# Altium PCB Ethernet-Module.PcbDoc (part 1 of 2)
Units mm, origin at the board's own origin, x right, y up, seen from the top; angles counter-clockwise.
Board outline 33 x 53 mm, 2 copper layers (Top Layer, Bottom Layer), stack 0.97 mm thick; 59 components, 47 nets, 237 pads, 62 vias.
Unrouted connection lines stored in the file: 33.
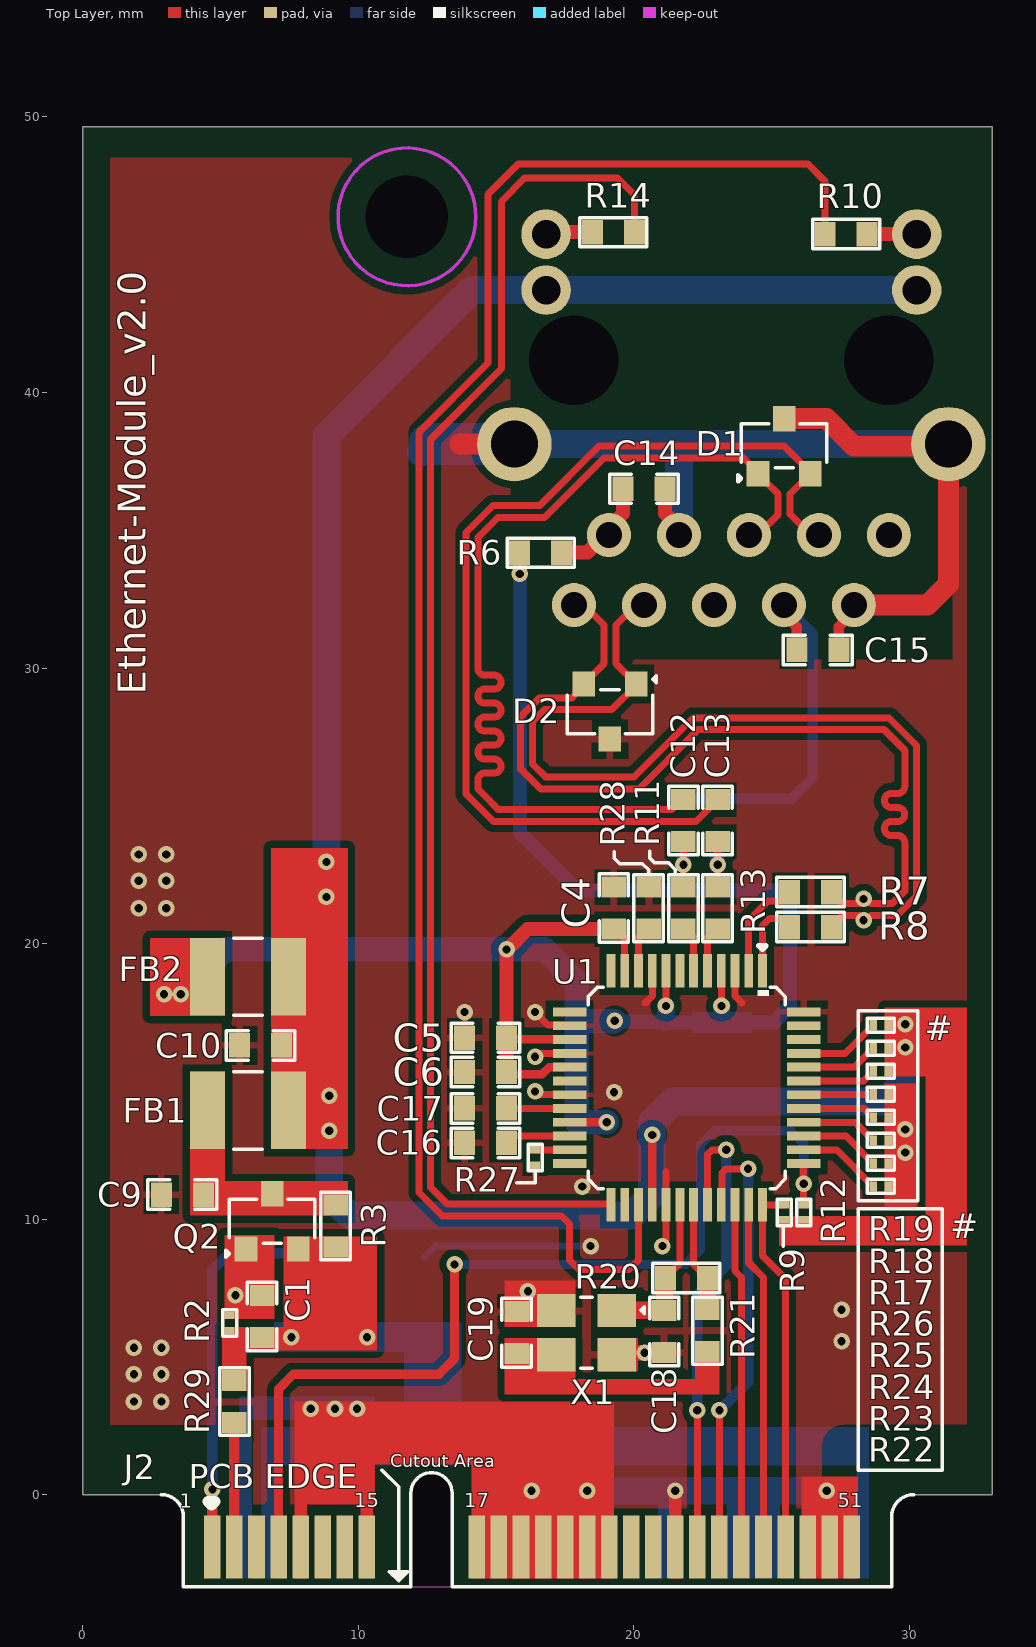
[diagram p0: Top Layer view]
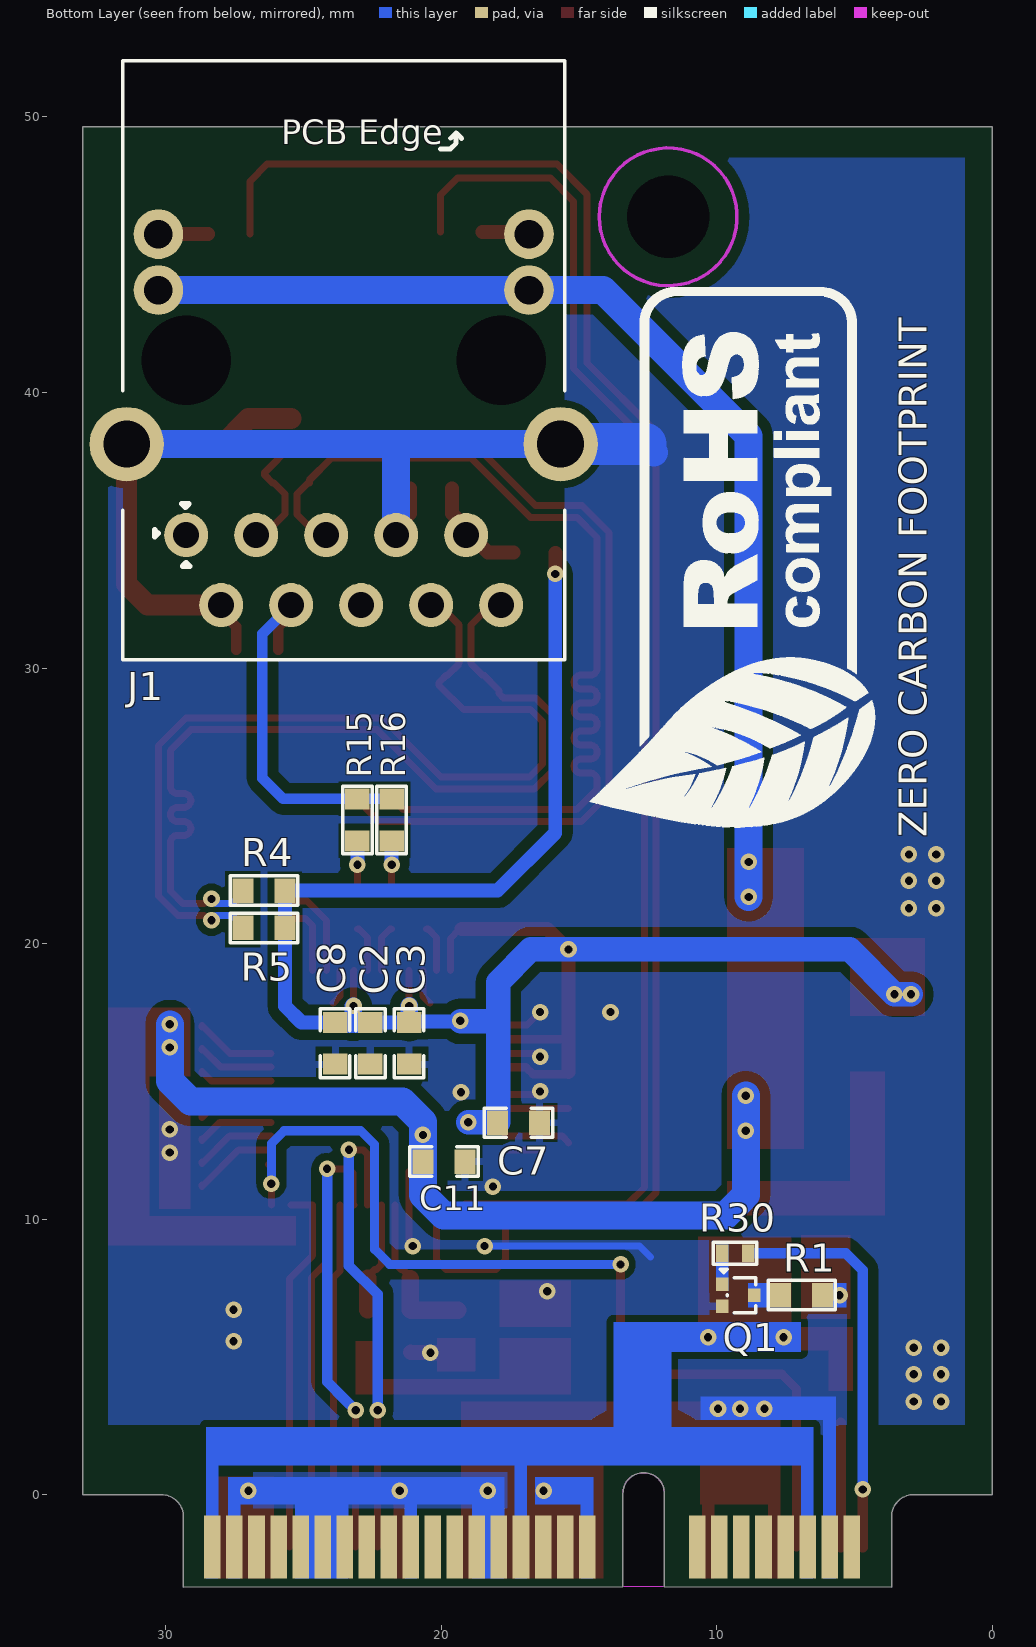
[diagram p1: Bottom Layer view, seen from below]
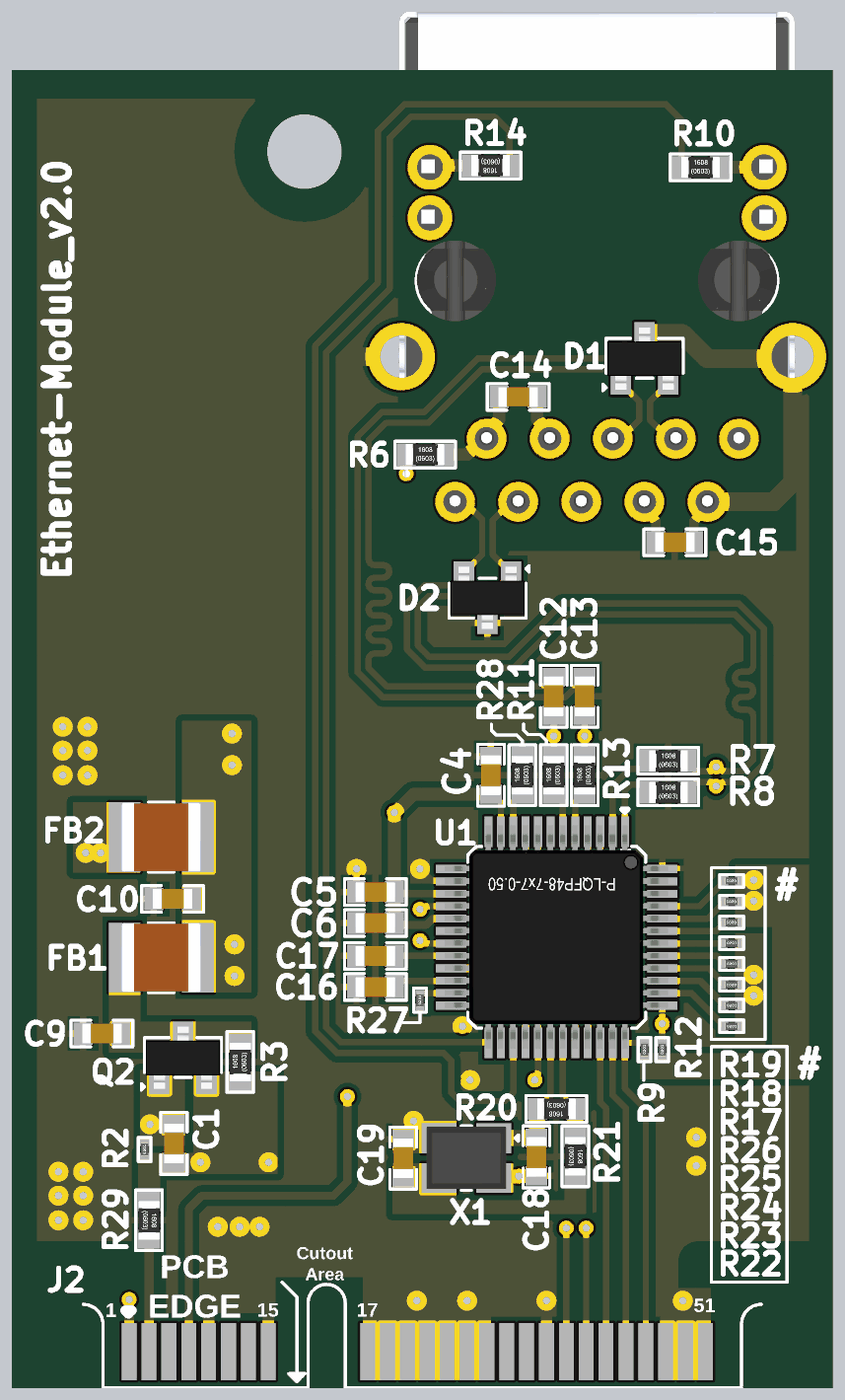
[diagram p2: 3D render of the assembled board from above, using the file's embedded part models]
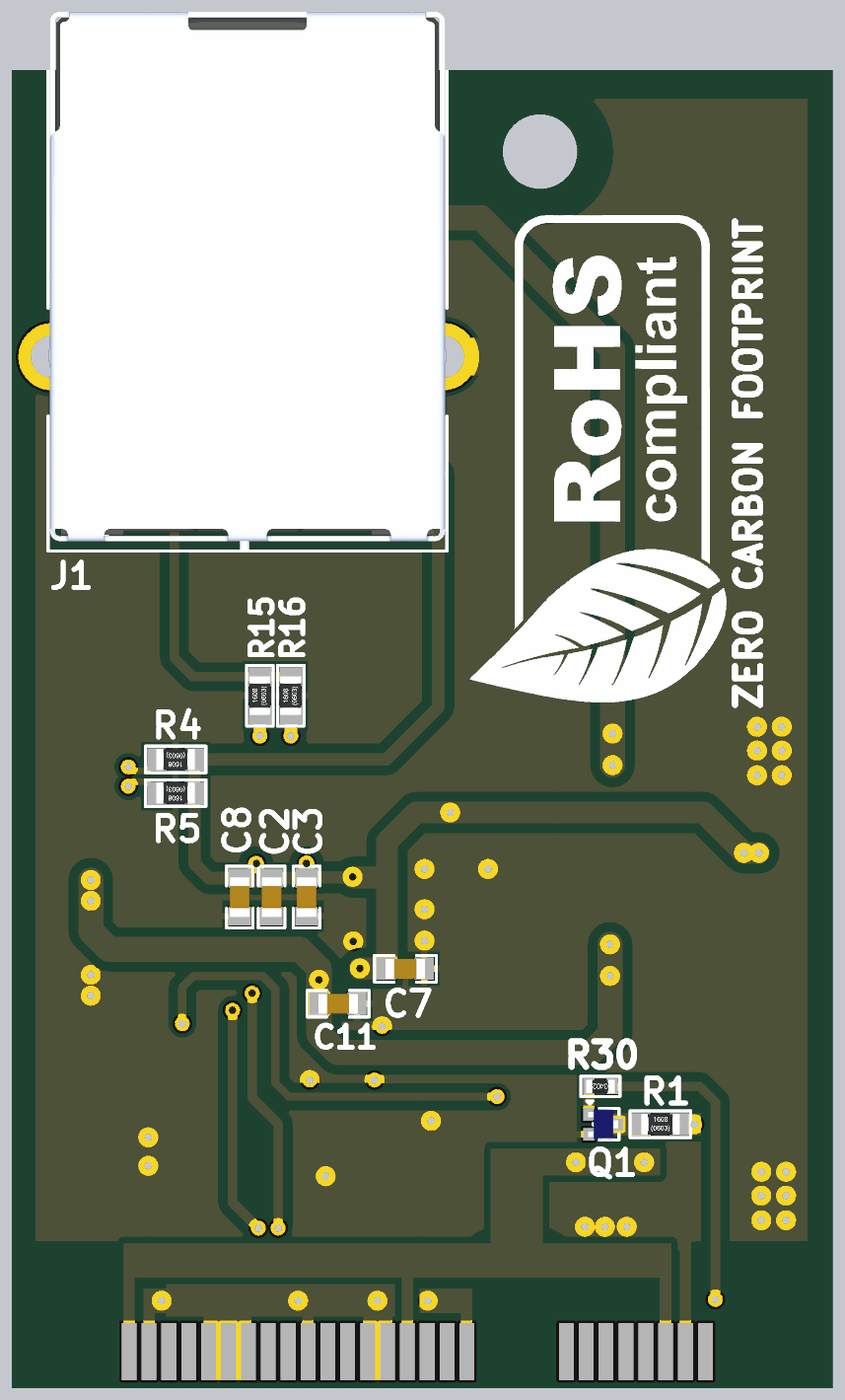
[diagram p3: 3D render of the assembled board from below, using the file's embedded part models]

## Layer stack, top to bottom
Top Solder: solder mask 0.015, Solder Resist, Dk 3.5
Top Layer: signal copper 0.035
Dielectric 1: dielectric 0.9, FR-4, Dk 4.8
Bottom Layer: signal copper 0.035
Bottom Solder: solder mask 0.015, Solder Resist, Dk 3.5

## Board outline
3.65,-3.355 3.65,-0.8 ccw(c2.85,-0.8) 2.85,0 0,0 0,49.642 33,49.642 33,0 30.15,0 ccw(c30.15,-0.8) 29.35,-0.8 29.35,-3.355 13.399,-3.35 13.399,-3.349 13.4,0.051 ccw(c12.65,0.051) 11.9,0.051 11.899,-3.349 11.899,-3.35
cut-out: 11.899,-3.349 13.399,-3.35 13.399,-3.349 13.4,0.051 ccw(c12.65,0.051) 11.9,0.051

## Design rules (kind name [scope] priority, off if disabled: settings)
Clearance Clearance_Top [OnLayer('Top Layer')] p1: gap=0.178 ignorepadtopadclearanceinfootprint=FALSE except(0.254: Arc-Fill Arc-Poly Arc-Region Track-Fill Track-Poly Track-Region SMDPad-Fill SMDPad-Poly SMDPad-Region THPad-Fill THPad-Poly THPad-Region Via-Fill Via-Poly Via-Region Fill-Fill Fill-Poly Fill-Region Poly-Poly Poly-Region Region-Region)
Clearance Clearance_Bottom [OnLayer('Bottom Layer')] p2: gap=0.178 ignorepadtopadclearanceinfootprint=FALSE except(0.254: SMDPad-Fill SMDPad-Poly SMDPad-Region Via-Fill Via-Poly Via-Region Fill-Fill Fill-Poly Fill-Region Poly-Poly Poly-Region Region-Region; 0.381: Arc-Fill Arc-Poly Arc-Region Track-Fill Track-Poly Track-Region THPad-Fill THPad-Poly THPad-Region)
DiffPairsRouting [All] p1: maxlimit=0.178 minlimit=0.178 mostfreqgap=0.178 toplayer_minwidth=0.254 toplayer_maxwidth=0.254 toplayer_prefwidth=0.254 bottomlayer_minwidth=0.254 bottomlayer_maxwidth=0.254 bottomlayer_prefwidth=0.254 impedanceprofiledriven=TRUE impedanceprofileid={129A74C7-0EF2-4F0A-B9E0-2A440151345B} impedanceprofilevalue=100.000000 maxuncoupledlength=12.7
HoleSize [All] p1: absolutevalues=TRUE maxlimit=25.4 minlimit=0.025 maxpercent=80.000 minpercent=20.000
HoleToHoleClearance [All] p1: gap=0.203 allowstackedmicrovias=TRUE
MatchedLengths "Schematic Matched Net Lengths_1" [InNetClass('EtherCAT_A')] p1: tolerance=0.508 checknetsindiffpair=FALSE checkdiffpairvsdiffpair=TRUE checkxsignals=TRUE checkothers=TRUE
MaxMinImpedance "Schematic Impedance Constraint_1" [InNetClass('EtherCAT_A')] p1: minimum=85.00 maximum=95.00
MinimumSolderMaskSliver [All] p1: minsoldermaskwidth=0
PolygonConnect [All] p1: thpad.connectstyle=Relief thpad.reliefconductorwidth=0.254 thpad.reliefentries=4 thpad.polygonreliefangle="90 Angle" thpad.airgapwidth=0.254 smdpad.connectstyle=Relief smdpad.reliefconductorwidth=0.254 smdpad.reliefentries=4 smdpad.polygonreliefangle="90 Angle" smdpad.airgapwidth=0.254 via.connectstyle=Direct via.reliefconductorwidth=0.254 via.reliefentries=4 via.polygonreliefangle="90 Angle" via.airgapwidth=0.254
RoutingVias [All] p1: holewidth=0.3 width=0.6 viastyle="Through Hole" minholewidth=0.3 minwidth=0.6 maxholewidth=0.3 maxwidth=0.6
SilkToSilkClearance [All] p1: silktosilkclearance=0
SilkToSolderMaskClearance [IsPad] p1: minsilkscreentomaskgap=0 clearancetoexposedcopper=TRUE
SolderMaskExpansion [All] p1: expansion=0.102 istentingtop=FALSE
UnRoutedNet [All] p1: checkbadconnections=TRUE
Width [All] p1: maxlimit=1.524 minlimit=0.254 preferedwidth=0.381 minimp=50.000000 maximp=50.000000 favimp=50.000000
23 further rules are at their usual default settings.

## Classes and differential pairs
differential pair class EtherCAT_A_Lines: RD TD
net class EtherCAT_A: RD_N RD_P TD_N TD_P
differential pair TD: +TD_P -TD_N
differential pair RD: +RD_P -RD_N

## Components (designator, comment, footprint, x,y, rotation, side; value= is the part's Value field where it differs from the comment)
C1 "22uF" Cap-0603 6.502,6.472 r270 top locked
C2 "0.1uF" Cap-0603 22.566,16.383 r90 bottom
C3 "0.1uF" Cap-0603 21.158,16.383 r90 bottom
C4 "0.1uF" Cap-0603 19.266,21.285 r270 top
C5 "0.1uF" Cap-0603 14.614,16.584 r0 top
C6 "0.1uF" Cap-0603 14.614,15.34 r0 top
C7 "0.1uF" Cap-0603 17.184,13.498 r0 bottom
C8 "10uF" Cap-0603 23.847,16.383 r90 bottom
C9 "22uF" Cap-0603 3.607,10.893 r0 top locked
C10 "10uF" Cap-0603 6.452,16.307 r0 top locked
C11 "0.1uF" Cap-0603 19.888,12.09 r0 bottom
C12 "6.8nF" Cap-0603 21.793,24.46 r270 top
C13 "6.8nF" Cap-0603 23.038,24.46 r270 top
C14 "22nF" Cap-0603 20.361,36.507 r180 top
C15 "10nF" Cap-0603 26.67,30.658 r180 top
C16 "10nF" Cap-0603 14.614,12.767 r0 top
C17 "4.7uF" Cap-0603 14.614,14.016 r0 top
C18 "12pF" Cap-0603 21.097,5.928 r90 top
C19 "12pF" Cap-0603 15.737,5.877 r270 top
D1 "SP0502BAHTG" SOT-23 25.451,38.049 r0 top
D2 "SP0502BAHTG" SOT-23 19.126,28.423 r180 top
FB1 "FBMH3225HM601NT" IND-1210 5.992,13.945 r0 top locked
FB2 "FBMH3225HM601NT" IND-1210 5.992,18.796 r180 top
J1 "ARJM11D7-114-AB-EW2" ARJM11D7-114-AB-EW2 23.536,39.106 r0 bottom locked
J2 "Mini PCIe" "Mini PCIE Pad" 4.7,-1.9 r0 top locked
Q1 "MMBT3904M" SOT-723 9.215,7.239 r270 bottom locked
Q2 "FDN306P" SOT-23 6.868,9.915 r0 top locked
R1 "1K" Res-0603 6.912,7.244 r0 bottom
R2 "10K" Res-0201 5.323,6.228 r90 top locked
R3 "0R" Res-0603 9.172,9.75 r270 top locked
R4 "49.9R" Res-0603 26.429,21.921 r180 bottom
R5 "49.9R" Res-0603 26.429,20.567 r180 bottom
R6 "10R" Res-0603 16.616,34.186 r180 top locked
R7 "33R" Res-0603 26.407,21.866 r180 top
R8 "33R" Res-0603 26.407,20.596 r180 top
R9 "10K" Res-0201 25.446,10.245 r90 top
R10 "330R" Res-0603 27.703,45.746 r180 top
R11 "33R" Res-0603 21.793,21.285 r270 top
R12 "10K" Res-0201 26.16,10.245 r90 top
R13 "33R" Res-0603 23.038,21.285 r270 top
R14 "330R" Res-0603 19.253,45.817 r0 top locked
R15 "49.9R" Res-0603 23.038,24.486 r270 bottom
R16 "49.9R" Res-0603 21.793,24.486 r270 bottom
R17 "10K" Res-0201 28.956,15.364 r180 top
R18 "10K" Res-0201 28.956,16.2 r180 top
R19 "10K" Res-0201 28.956,17.036 r180 top
R20 "1M" Res-0603 21.9,7.859 r0 top
R21 "0R" Res-0603 22.662,5.954 r90 top
R22 "10K" Res-0201 28.956,11.186 r0 top
R23 "10K" Res-0201 28.956,12.022 r0 top
R24 "10K" Res-0201 28.956,12.858 r180 top
R25 "10K" Res-0201 28.956,13.693 r0 top
R26 "10K" Res-0201 28.956,14.529 r0 top
R27 "10K" Res-0201 16.409,12.237 r90 top
R28 "12.4K" Res-0603 20.53,21.285 r270 top
R29 "0R" Res-0603 5.499,3.378 r90 top
R30 "4.7K" Res-0402 9.328,8.764 r0 bottom locked
U1 "W5500" "48-LQFP (7x7)_" 21.915,14.766 r270 top locked
X1 "25MHZ" NX3225GA-25MHZ-STD-CRG-2 18.277,5.877 r180 top

## Footprints (in the part's own frame and the unit in brackets; to place one, negate y for a bottom-side part, rotate by r counter-clockwise, add the part's x,y. Pads: shape width x height; smd on the part's side, far side on the other; paste and mask are expansions set on the pad)
"48-LQFP (7x7)_" [mm]
  rect 1.22x0.32 smd: 1(-4.25,2.75) 2(-4.25,2.25) 3(-4.25,1.75) 4(-4.25,1.25) 5(-4.25,0.75) 6(-4.25,0.25) 7(-4.25,-0.25) 8(-4.25,-0.75) 9(-4.25,-1.25) 10(-4.25,-1.75) 11(-4.25,-2.25) 12(-4.25,-2.75) 25(4.25,-2.75) 26(4.25,-2.25) 27(4.25,-1.75) 28(4.25,-1.25) 29(4.25,-0.75) 30(4.25,-0.25) 31(4.25,0.25) 32(4.25,0.75) 33(4.25,1.25) 34(4.25,1.75) 35(4.25,2.25) 36(4.25,2.75)
  rect 0.32x1.22 smd: 13(-2.75,-4.25) 14(-2.25,-4.25) 15(-1.75,-4.25) 16(-1.25,-4.25) 17(-0.75,-4.25) 18(-0.25,-4.25) 19(0.25,-4.25) 20(0.75,-4.25) 21(1.25,-4.25) 22(1.75,-4.25) 23(2.25,-4.25) 24(2.75,-4.25) 37(2.75,4.25) 38(2.25,4.25) 39(1.75,4.25) 40(1.25,4.25) 41(0.75,4.25) 42(0.25,4.25) 43(-0.25,4.25) 44(-0.75,4.25) 45(-1.25,4.25) 46(-1.75,4.25) 47(-2.25,4.25) 48(-2.75,4.25)
  silkscreen extent -5.16,-3.58 3.66,3.58, body extent -4.51,-4.51 4.49,4.49, height 1.43
ARJM11D7-114-AB-EW2 [mm]
  round 1.6 hole 0.94: 1(5.715,4.28) 2(4.445,6.82) 3(3.175,4.28) 4(1.905,6.82) 5(0.635,4.28) 6(-0.635,6.82) 7(-1.905,4.28) 8(-3.175,6.82) 9(-4.445,4.28) 10(-5.715,6.82)
  round 1.8 hole 1.04: 11(6.725,-4.61) 12(6.725,-6.64) 13(-6.725,-4.61) 14(-6.725,-6.64)
  round 0 hole 3.25 unplated: MH1(-5.715,-2.07) MH2(5.715,-2.07)
  round 2.7 hole 1.7: SH1(-7.875,0.98) SH2(7.875,0.98)
  silkscreen extent -8.03,-12.93 8.03,8.8, body extent -7.99,-12.9 7.99,8.75, height 13.8
Cap-0603 [mil]
  rect 30x35 smd mask+2.36: 1(-30,0) 2(30,0)
  silkscreen extent -49,-21 49,21, body extent -32,-16 31,16, height 34
IND-1210 [mm]
  rect 1.27x2.81 smd: 1(-1.471,0) 2(1.471,0)
  silkscreen extent -0.52,-1.4 0.52,1.4, body extent -1.6,-1.4 1.6,1.4, height 2.5
"Mini PCIE Pad" [mm]
  rect 0.6x2.3 smd: 1(0,0) 3(0.8,0) 5(1.6,0) 7(2.4,0) 9(3.2,0) 11(4,0) 13(4.8,0) 15(5.6,0) 17(9.6,0) 19(10.4,0) 21(11.2,0) 23(12,0) 25(12.8,0) 27(13.6,0) 29(14.4,0) 31(15.2,0) 33(16,0) 35(16.8,0) 37(17.6,0) 39(18.4,0) 41(19.2,0) 43(20,0) 45(20.8,0) 47(21.6,0) 49(22.4,0) 51(23.2,0)
  rect 0.6x2.3 smd far side: 2(0.4,0) 4(1.2,0) 6(2,0) 8(2.8,0) 10(3.6,0) 12(4.4,0) 14(5.2,0) 16(6,0) 18(10,0) 20(10.8,0) 22(11.6,0) 24(12.4,0) 26(13.2,0) 28(14,0) 30(14.8,0) 32(15.6,0) 34(16.4,0) 36(17.2,0) 38(18,0) 40(18.8,0) 42(19.6,0) 44(20.4,0) 46(21.2,0) 48(22,0) 50(22.8,0) 52(23.6,0)
  silkscreen extent -1.85,-1.45 25.45,2.79
NX3225GA-25MHZ-STD-CRG-2 [mm]
  rect 1.4x1.2 smd: 1(-1.1,-0.8) 2(1.1,-0.8) 3(1.1,0.8) 4(-1.1,0.8)
  silkscreen extent -2.09,-1.3 0.2,1.3, body extent -1.6,-1.26 1.6,1.24, height 0.8
Res-0201 [mm]
  rect 0.27x0.37 smd mask+0.055: 1(-0.275,0) 2(0.275,0)
  silkscreen extent -0.48,-0.25 0.48,0.25, body extent -0.3,-0.15 0.3,0.15, height 0.29
Res-0402 [mil]
  rect 18x25 smd mask+2.17: 1(-18.5,0) 2(18.5,0)
  silkscreen extent -32,-17 32,16, body extent -23,-11 23,11, height 16
Res-0603 [mil]
  rect 30x35 smd: 1(-30,0) 2(30,0)
  silkscreen extent -48,-21 48,21, body extent -31,-17 31,17, height 18
SOT-23 [mm] "TRANS NPN 40V 0.6A SOT23"
  rect 0.82x0.92 smd: 1(-0.95,-1) 2(0.95,-1) 3(0,1)
  silkscreen extent -1.68,-1.3 1.55,0.81, body extent -1.5,-1.25 1.5,1.25, height 1.05
SOT-723 [mm]
  rect 0.5x0.45 smd: 1(-0.4,-0.575) 2(0.4,-0.575) 3(0,0.575)
  silkscreen extent -0.94,-0.66 0.64,0.64, body extent -0.6,-0.6 0.6,0.6, height 0.5

## Part data
C1 C9: library part CC0603MRX5R6BB226, "CAP CER 22UF 10V X5R 0603", Case Code (Imperial)=0603, Case Code (Metric)=1608, Dielectric=X5R, LCSC Part Number=C109447, Manufacturer=Yageo, Max Operating Temperature=85°C, Min Operating Temperature=-55°C, Package Quantity=4000, Supplier Part Number 1=311-1819-1-ND, Tolerance=20%, Voltage Rating=10V, Capacitance=22uF, Case/Package=0603, Category="Ceramic Capacitors", ComponentLink1Description=http://www.mouser.com/ds/2/447/Yageo_UPY-GP_NP0_16V-to-50V_9-358835.pdf?src-supplier=Mouser, ComponentLink1URL=http://www.mouser.com/ds/2/447/Yageo_UPY-GP_NP0_16V-to-50V_9-358835.pdf?src-supplier=Mouser, ComponentLink2Description=http://www.yageo.com/documents/recent/UPY-GPHC_X5R_4V-to-50V_25.pdf?src-supplier=Digi-Key, ComponentLink2URL=http://www.yageo.com/documents/recent/UPY-GPHC_X5R_4V-to-50V_25.pdf?src-supplier=Digi-Key, Halogen Free="Halogen Free", Height=0.8mm, Item Type=Capacitor, Lead Free="Lead Free", Length=0.063inch, Manufacturer Part Number=CC0603MRX5R6BB226, Mount="Surface Mount", Packaging="Tape and Reel", Pricing 1="1=0.68000, 10=0.48000, 50=0.36300, 100=0.31610, 500=0.23416, 1000=0.19903 (USD)", RoHS=Yes, RoHS Compliant=Yes, Stock 1=19628, Supplier 1=Digi-Key, Termination=SMD/SMT, Thickness=0.035inch, Voltage Rating (DC)=10V, Weight=7.1E-05oz, Width=0.8mm
C2 C3 C4 C5 C6 C7 C11: library part CC0603KRX5R9BB104, "CAP CER 0.1UF 50V X5R 0603", Capacitance=100nF, Case Code (Imperial)=0603, Case Code (Metric)=1608, Dielectric=X5R, LCSC Part Number=C110022, Manufacturer=Yageo, Max Operating Temperature=85°C, Min Operating Temperature=-55°C, Package Quantity=4000, Supplier Part Number 1=311-4046-1-ND, Tolerance=10%, Voltage Rating=50V, Case/Package=0603, Category="Ceramic Capacitors", ComponentLink1Description=http://www.mouser.com/ds/2/447/Yageo_UPY-GP_NP0_16V-to-50V_9-358835.pdf?src-supplier=Mouser, ComponentLink1URL=http://www.mouser.com/ds/2/447/Yageo_UPY-GP_NP0_16V-to-50V_9-358835.pdf?src-supplier=Mouser, ComponentLink2Description=https://www.yageo.com/upload/media/product/productsearch/datasheet/mlcc/UPY-GPHC_X5R_4V-to-50V_26.pdf?src-supplier=Digi-Key, ComponentLink2URL=https://www.yageo.com/upload/media/product/productsearch/datasheet/mlcc/UPY-GPHC_X5R_4V-to-50V_26.pdf?src-supplier=Digi-Key, ComponentLink3Description=http://www.yageo.com/exep/pages/download/literatures/ProductSelectionGuide%202014_Final_2.pdf?src-supplier=Digi-Key, ComponentLink3URL=http://www.yageo.com/exep/pages/download/literatures/ProductSelectionGuide%202014_Final_2.pdf?src-supplier=Digi-Key, Halogen Free="Halogen Free", Item Type=Capacitor, Lead Free="Lead Free", Length=0.063inch, Manufacturer Part Number=CC0603KRX5R9BB104, Mount="Surface Mount", Packaging="Tape and Reel", Pricing 1="1=0.10000, 10=0.05200, 50=0.02820, 100=0.02310, 500=0.01648, 1000=0.01294 (USD)", RoHS=Yes, Stock 1=152253, Supplier 1=Digi-Key, Termination=SMD/SMT, Thickness=0.035inch, Voltage Rating (DC)=50V, Weight=7.1E-05oz, Width=0.031inch
C8 C10: library part C1608X5R1E106M080AC, "CAP CER 10UF 25V X5R 0603", Case Code (Imperial)=0603, Case Code (Metric)=1608, Dielectric=X5R, Dielectric Material=Ceramic, LCSC Part Number=C2168289, Manufacturer=TDK, Max Operating Temperature=85°C, Min Operating Temperature=-55°C, Package Quantity=1, Supplier Part Number 1=445-9015-1-ND, Tolerance=20%, Voltage Rating=25V, Capacitance=10uF, Case/Package=0603, Composition=Ceramic, Depth=0.8mm, Height=0.8mm, Lead Free="Lead Free", Length=1.6mm, Manufacturer Part Number=C1608X5R1E106M080AC, Mount="Surface Mount", Packaging="Tape and Reel", Pricing 1="1=0.96, 10=0.704, 100=0.483, 500=0.38238, 1000=0.322 (USD)", REACH SVHC="No SVHC", Stock 1=61681, Supplier 1=Digi-Key, Termination=SMD/SMT, Thickness=0.039inch, Voltage Rating (DC)=25V, Weight=7.1E-05oz, Width=0.8mm
C12 C13: library part 0603B682K500NT, "50V 6.8nF X7R ±10% 0603", LCSC Part Number=C1631, Manufacturer=FH, ComponentLink1Description=LCSC, ComponentLink1URL=https://www.lcsc.com/product-detail/Multilayer-Ceramic-Capacitors-MLCC-SMD-SMT_FH-Guangdong-Fenghua-Advanced-Tech-0603B682K500NT_C1631.html, Item Type=Capacitor, Manufacturer Part Number=0603B682K500NT
C14: library part CGA3E2X7R2A223K080AA, "CAP CER 0.022UF 100V X7R 0603", Case Code (Imperial)=0603, Case Code (Metric)=1608, Dielectric=X7R, LCSC Part Number=C2167165, Manufacturer=TDK, Max Operating Temperature=125°C, Min Operating Temperature=-55°C, Package Quantity=1, Ratings=AEC-Q200, Resistor Type=Ceramic, Supplier Part Number 1=445-5814-1-ND, Tolerance=10%, Voltage Rating=100V, Capacitance=22nF, Case/Package=0603, Category="Ceramic Capacitors", ComponentLink1Description=https://datasheet.ciiva.com/22725/1735406-22725648.pdf?src-supplier=Element14, ComponentLink1URL=https://datasheet.ciiva.com/22725/1735406-22725648.pdf?src-supplier=Element14, ComponentLink2Description=https://datasheet.ciiva.com/24218/cga3e2x7r2a223k080aa-266292-24218959.pdf?src-supplier=Mouser, ComponentLink2URL=https://datasheet.ciiva.com/24218/cga3e2x7r2a223k080aa-266292-24218959.pdf?src-supplier=Mouser, ComponentLink3Description=https://datasheet.ciiva.com/7975/1807242-7975349.pdf?src-supplier=Element14, ComponentLink3URL=https://datasheet.ciiva.com/7975/1807242-7975349.pdf?src-supplier=Element14, Depth=0.8mm, Height=0.8mm, Item Type=Capacitor, Length=1.6mm, Manufacturer Part Number=CGA3E2X7R2A223K080AA, Mount="Surface Mount", Packaging="Tape and Reel", Pricing 1="1=0.11000, 10=0.07600, 50=0.04340, 100=0.03590, 500=0.02516, 1000=0.02083 (USD)", REACH SVHC="No SVHC", RoHS=Yes, RoHS Compliant=Yes, Series=CGA, Stock 1=56079, Supplier 1=Digi-Key, Termination=SMD/SMT, Thickness=0.035inch, Voltage Rating (DC)=100V, Weight=7.1E-05oz, Width=0.031inch
C15 C16: library part AC0603KRX7R0BB103, "CAP CER 10000PF 100V X7R 0603", Case Code (Imperial)=0603, Case Code (Metric)=1608, LCSC Part Number=C149602, Manufacturer=Yageo, Max Operating Temperature=125°C, Min Operating Temperature=-55°C, Ratings=AEC-Q200, Supplier Part Number 1=1985307, Tolerance=10%, Voltage Rating=100V, Capacitance=10nF, Case/Package=0603, Category="Ceramic Capacitors", ComponentLink1Description=http://www.yageo.com/NewPortal/_en/search/productDocs.jsp?YageoPartNumber=AC0603KRX7R0BB103&src-supplier=Digi-Key, ComponentLink1URL=http://www.yageo.com/NewPortal/_en/search/productDocs.jsp?YageoPartNumber=AC0603KRX7R0BB103&src-supplier=Digi-Key, ComponentLink2Description=https://www.yageo.com/upload/media/product/productsearch/datasheet/mlcc/UPY-AC_NP0X7R_16V-to-630V_12.pdf?src-supplier=Digi-Key, ComponentLink2URL=https://www.yageo.com/upload/media/product/productsearch/datasheet/mlcc/UPY-AC_NP0X7R_16V-to-630V_12.pdf?src-supplier=Digi-Key, Item Type=Capacitor, Lead Free="Lead Free", Manufacturer Part Number=AC0603KRX7R0BB103, Mount="Surface Mount", Packaging="Tape and Reel", Pricing 1="250=0.02700, 1000=0.02500, 2000=0.02100 (GBP)", RoHS=Yes, RoHS Compliant=Yes, Stock 1=750, Supplier 1=RSComponents
C17: library part C1608X5R1E475KT000E, "CAP CER, 4.7 µF, 25 V, 0603", Case Code (Imperial)=0603, Case Code (Metric)=1608, Dielectric=X5R, Dielectric Material=Ceramic, LCSC Part Number=C76615, Manufacturer=TDK, Max Operating Temperature=85°C, Min Operating Temperature=-55°C, Package Quantity=4000, Supplier Part Number 1=2220Y1000562GCT-ND, Tolerance=10%, Voltage Rating=25V, Capacitance=4.7uF, Case/Package=0603, Category="Ceramic Capacitors", ComponentLink1Description=https://datasheet.ciiva.com/48587/6print-detail-pdf-phplangenpart-noc1608x5r1e475k080acimp-unit-xmhz-48587141.pdf?src-supplier=Onlinecomponents.com, ComponentLink1URL=https://datasheet.ciiva.com/48587/6print-detail-pdf-phplangenpart-noc1608x5r1e475k080acimp-unit-xmhz-48587141.pdf?src-supplier=Onlinecomponents.com, ComponentLink2Description=https://datasheet.ciiva.com/24216/mlcc-commercial-general-en-24216326.pdf?src-supplier=Mouser, ComponentLink2URL=https://datasheet.ciiva.com/24216/mlcc-commercial-general-en-24216326.pdf?src-supplier=Mouser, ComponentLink3Description=https://datasheet.ciiva.com/48671/mlcc-commercial-general-en-48671304.pdf?src-supplier=Avnet, ComponentLink3URL=https://datasheet.ciiva.com/48671/mlcc-commercial-general-en-48671304.pdf?src-supplier=Avnet, Depth=0.8mm, Height=0.8mm, Lead Free="Lead Free", Length=1.6mm, Manufacturer Part Number=C1608X5R1E475KT000E, Mount="Surface Mount", Packaging="Tape and Reel", Pricing 2="100=0.23400, 200=0.21900, 1000=0.20700, 2000=0.18700 (GBP)", REACH SVHC="No SVHC", Resistor Type=Ceramic, RoHS=No, Stock 2=16120, Supplier 1=Digi-Key, Supplier 2=RSComponents, Supplier Part Number 2=9159158P, Termination=SMD/SMT, Thickness=0.039inch, Voltage Rating (DC)=25V, Weight=7.1E-05oz, Width=0.031inch
C18 C19: library part GCM1885C2A120JA16D, "CAP CER 12PF 100V C0G/NP0 0603", Case Code (Imperial)=0603, Case Code (Metric)=1608, Dielectric=C0G, LCSC Part Number=C701298, Manufacturer=Murata, Max Operating Temperature=125°C, Min Operating Temperature=-55°C, Package Quantity=4000, Ratings=AEC-Q200, Tolerance=5%, Voltage Rating=100V, Capacitance=12pF, Case/Package=0603, Category="Ceramic Capacitors", ComponentLink1Description=https://datasheet.ciiva.com/26843/getdatasheetpartid-298064-26843669.pdf?src-supplier=Verical, ComponentLink1URL=https://datasheet.ciiva.com/26843/getdatasheetpartid-298064-26843669.pdf?src-supplier=Verical, ComponentLink2Description=https://datasheet.ciiva.com/29541/s0717e-29541093.pdf?src-supplier=Digi-Key, ComponentLink2URL=https://datasheet.ciiva.com/29541/s0717e-29541093.pdf?src-supplier=Digi-Key, ComponentLink3Description=https://datasheet.ciiva.com/29541/s0717e-29541094.pdf?src-supplier=Digi-Key, ComponentLink3URL=https://datasheet.ciiva.com/29541/s0717e-29541094.pdf?src-supplier=Digi-Key, ComponentLink4Description=https://datasheet.ciiva.com/29541/s0717e-29541095.pdf?src-supplier=Digi-Key, ComponentLink4URL=https://datasheet.ciiva.com/29541/s0717e-29541095.pdf?src-supplier=Digi-Key, Construction=Flat, Depth=0.8mm, Height=0.8mm, Lead Free="Lead Free", Length=1.6mm, Manufacturer Part Number=GCM1885C2A120JA16D, Mount="Surface Mount", Packaging="Tape and Reel", Pricing 1="4000=0.02030, 8000=0.01800, 12000=0.01680, 28000=0.01670, 100000=0.01630 (USD)", Radiation Hardening=No, RoHS=Yes, RoHS Compliant=Yes, Series=GCM, Stock 1=12000, Supplier 1="Arrow Electronics", Supplier Part Number 1=GCM1885C2A120JA16D, Termination=SMD/SMT, Thickness=0.035inch, Voltage Rating (DC)=100V, Width=0.031inch
D1 D2: "TVS DIODE 5.5VWM 8.5VC SOT23-3", LCSC Part Number=C207261, Manufacturer=Littelfuse, Supplier Part Number=5544929, Category="TVS Diodes", ComponentLink1Description=https://datasheet.ciiva.com/332/sp05xxba-332272.pdf?src-supplier=Digi-Key, ComponentLink1URL=https://datasheet.ciiva.com/332/sp05xxba-332272.pdf?src-supplier=Digi-Key, ComponentLink2Description=https://datasheet.ciiva.com/5771/littefuse-spa-sp050x-5771122.pdf?src-supplier=Farnell, ComponentLink2URL=https://datasheet.ciiva.com/5771/littefuse-spa-sp050x-5771122.pdf?src-supplier=Farnell, ComponentLink3Description=https://datasheet.ciiva.com/4508/sp05x-leadfree-4508925.pdf?src-supplier=Mouser, ComponentLink3URL=https://datasheet.ciiva.com/4508/sp05x-leadfree-4508925.pdf?src-supplier=Mouser, ComponentLink4Description=https://datasheet.ciiva.com/14536/70184671-14536037.pdf?src-supplier=Allied+Electronics, ComponentLink4URL=https://datasheet.ciiva.com/14536/70184671-14536037.pdf?src-supplier=Allied+Electronics, ComponentLink5Description=https://datasheet.ciiva.com/22735/526672-22735323.pdf?src-supplier=Element14, ComponentLink5URL=https://datasheet.ciiva.com/22735/526672-22735323.pdf?src-supplier=Element14, ComponentLink6Description=https://datasheet.ciiva.com/16392/sp05x-leadfree-16392807.pdf?src-supplier=Future+Electronics, ComponentLink6URL=https://datasheet.ciiva.com/16392/sp05x-leadfree-16392807.pdf?src-supplier=Future+Electronics, ComponentLink7Description=https://datasheet.ciiva.com/332/sp05xxba-332270.pdf?src-supplier=Digi-Key, ComponentLink7URL=https://datasheet.ciiva.com/332/sp05xxba-332270.pdf?src-supplier=Digi-Key, ComponentLink8Description=https://datasheet.ciiva.com/332/sp05xxba-332271.pdf?src-supplier=Digi-Key, ComponentLink8URL=https://datasheet.ciiva.com/332/sp05xxba-332271.pdf?src-supplier=Digi-Key, Item Type="TVS Diode", Manufacturer Part Number=SP0502BAHTG, Pricing="1=0.78, 15=0.685, 75=0.625, 300=0.575, 1500=0.52 (USD)", RoHS=Yes, Stock=1160, Supplier="Future Electronics"
FB1 FB2: "FERRITE BEAD 600 OHM 1210 1LN", Case Code (Imperial)=1210, Case Code (Metric)=3225, Current Rating=3A, DC Resistance (DCR)=42mR, Frequency=100MHz, LCSC Part Number=C268004, Manufacturer="Taiyo Yuden", Max Operating Temperature=125°C, Min Operating Temperature=-40°C, Package Quantity=1, Resistor Type="Ferrite Bead", Tolerance=30%, Case/Package=1210, Category="Ferrite Beads and Chips", ComponentLink1Description=https://datasheet.ciiva.com/6212/fbmh3225hm601nt-ss-6212657.pdf?src-supplier=Digi-Key, ComponentLink1URL=https://datasheet.ciiva.com/6212/fbmh3225hm601nt-ss-6212657.pdf?src-supplier=Digi-Key, ComponentLink2Description=https://datasheet.ciiva.com/16001/44fbmh3225hm601nt-16001086.pdf?src-supplier=Onlinecomponents.com, ComponentLink2URL=https://datasheet.ciiva.com/16001/44fbmh3225hm601nt-16001086.pdf?src-supplier=Onlinecomponents.com, ComponentLink3Description=https://datasheet.ciiva.com/25614/0900766b810b37be-25614375.pdf?src-supplier=Rs, ComponentLink3URL=https://datasheet.ciiva.com/25614/0900766b810b37be-25614375.pdf?src-supplier=Rs, ComponentLink4Description=https://datasheet.ciiva.com/7966/chipbeads01-e-7966154.pdf?src-supplier=Element14, ComponentLink4URL=https://datasheet.ciiva.com/7966/chipbeads01-e-7966154.pdf?src-supplier=Element14, ComponentLink5Description=https://datasheet.ciiva.com/1014/chipbeads01-e-1014606.pdf?src-supplier=Digi-Key, ComponentLink5URL=https://datasheet.ciiva.com/1014/chipbeads01-e-1014606.pdf?src-supplier=Digi-Key, ComponentLink6Description=https://datasheet.ciiva.com/1014/chipbeads01-e-1014605.pdf?src-supplier=Digi-Key, ComponentLink6URL=https://datasheet.ciiva.com/1014/chipbeads01-e-1014605.pdf?src-supplier=Digi-Key, Core Material=Ferrite, Depth=2.8mm, Halogen Free="Halogen Free", Height=2.8mm, Impedance=600R, Item Type="Ferrite Bead", Lead Free="Lead Free", Length=3.2mm, Manufacturer Part Number=FBMH3225HM601NT, Material=Ferrite, Max Current Rating=3A, Max DC Current=3A, Mounting Technology="Surface Mount", Number of Lines=1, Packaging="Tape and Reel", Pins=2, Pricing 1="1000=0.11115, 2000=0.10925, 4000=0.10735, 6000=0.10545, 8000=0.10355 (USD)", Reach SVHC Compliant=Yes, RoHS=Yes, RoHS Compliant=Yes, Series=FB, Shielding=Unshielded, Stock 1=56700, Supplier 1=Avnet, Supplier Part Number 1=FBMH3225HM601NT, Termination=SMD/SMT, Test Frequency=100MHz, Width=0.098inch
J1: "CONN JACK 1PORT 100 BASE-T PCB", Color=Green,Yellow, Manufacturer=Abracon, Max Operating Temperature=85°C, Min Operating Temperature=-40°C, Supplier Part Number 1=815-RJM11D7114ABEW2, Category="Modular / Ethernet Connectors", ComponentLink1Description=https://abracon.com/Magnetics/ARJM11.pdf?src-supplier=Digi-Key, ComponentLink1URL=https://abracon.com/Magnetics/ARJM11.pdf?src-supplier=Digi-Key, Connector Type=RJ45, Contact Plating=Gold, Direction=Up, Item Type="Ethernet Connector", Manufacturer Part Number=ARJM11D7-114-AB-EW2, Mounting Technology="Through Hole", Number of Cores per Jack=4, Number of Ports=1, Number of Rows=1, Packaging=Tray, Pricing 1="1=3.42, 10=3.29, 50=2.88, 100=2.73, 1000=1.98, 10000=1.77 (USD)", RoHS=Yes, RoHS Compliant=Yes, Series=ARJM11, Shielding=Shielded, Stock 1=4503, Supplier 1=Mouser, Termination=Solder
J2: "PCI Express Mini Card (Mini PCIe)"
Q1: "40V 100mW 100@10mA,1V 200mA 300MHz 300mV@50mA,5mA NPN -55℃~+150℃@(Tj) SOT-723 Bipolar Transistors - BJT ROHS", LCSC Part Number=C2923360, Manufacturer="TECH PUBLIC", Package=SOT-723, ComponentLink1Description=LCSC, ComponentLink1URL=https://www.lcsc.com/product-detail/Bipolar-Transistors-BJT_TECH-PUBLIC-MMBT3904M_C2923360.html, Item Type=Mosfet, Manufacturer Part Number=MMBT3904M
Q2: "MOSFET P-CH 12V 2.6A SUPERSOT3", Case/Package=TO-236-3, Continuous Drain Current (ID)=2.6A, Current=26A, Current Rating=-2.6A, Drain to Source Breakdown Voltage=-12V, Drain to Source Resistance=40mR, Drain to Source Voltage (Vdss)=12V, Drain-source On Resistance-Max=40MR, Gate to Source Voltage (Vgs)=8V, Input Capacitance=1.138nF, LCSC Part Number=C725031, Manufacturer="ON Semiconductor / Fairchild", Max Operating Temperature=150°C, Max Power Dissipation=500mW, Min Operating Temperature=-55°C, Package Quantity=3000, Supplier Part Number 1=FDN306PCT-ND, Threshold Voltage=-600mV, Category=MOSFETs, ComponentLink1Description=https://datasheet.ciiva.com/6383/fdn306p-6383301.pdf?src-supplier=Digi-Key, ComponentLink1URL=https://datasheet.ciiva.com/6383/fdn306p-6383301.pdf?src-supplier=Digi-Key, ComponentLink2Description=https://datasheet.ciiva.com/4439/fdn306p-50876-4439911.pdf?src-supplier=Mouser, ComponentLink2URL=https://datasheet.ciiva.com/4439/fdn306p-50876-4439911.pdf?src-supplier=Mouser, ComponentLink3Description=https://datasheet.ciiva.com/27050/889760-27050636.pdf?src-supplier=Jameco, ComponentLink3URL=https://datasheet.ciiva.com/27050/889760-27050636.pdf?src-supplier=Jameco, ComponentLink4Description=https://datasheet.ciiva.com/14170/fdn306p-eng-tds-14170925.pdf?src-supplier=Distrelec, ComponentLink4URL=https://datasheet.ciiva.com/14170/fdn306p-eng-tds-14170925.pdf?src-supplier=Distrelec, ComponentLink5Description=https://datasheet.ciiva.com/22700/264983-22700885.pdf?src-supplier=Element14, ComponentLink5URL=https://datasheet.ciiva.com/22700/264983-22700885.pdf?src-supplier=Element14, ComponentLink6Description=https://datasheet.ciiva.com/26144/fdn306p-26144214.pdf?src-supplier=Avnet+Europe, ComponentLink6URL=https://datasheet.ciiva.com/26144/fdn306p-26144214.pdf?src-supplier=Avnet+Europe, ComponentLink7Description=https://datasheet.ciiva.com/6383/fdn306p-6383304.pdf?src-supplier=Digi-Key, ComponentLink7URL=https://datasheet.ciiva.com/6383/fdn306p-6383304.pdf?src-supplier=Digi-Key, ComponentLink8Description=https://datasheet.ciiva.com/11175/fdn306p-11175160.pdf?src-supplier=Avnet, ComponentLink8URL=https://datasheet.ciiva.com/11175/fdn306p-11175160.pdf?src-supplier=Avnet, ComponentLink9Description=https://datasheet.ciiva.com/6383/fdn306p-6383306.pdf?src-supplier=Digi-Key, ComponentLink9URL=https://datasheet.ciiva.com/6383/fdn306p-6383306.pdf?src-supplier=Digi-Key, ComponentLink10Description=https://datasheet.ciiva.com/17275/fdn306p-17275114.pdf?src-supplier=Future+Electronics, ComponentLink10URL=https://datasheet.ciiva.com/17275/fdn306p-17275114.pdf?src-supplier=Future+Electronics, ComponentLink11Description=https://datasheet.ciiva.com/22655/fdn306p-22655327.pdf?src-supplier=Element14, ComponentLink11URL=https://datasheet.ciiva.com/22655/fdn306p-22655327.pdf?src-supplier=Element14, Contact Plating=Tin,Matte, Dual Supply Voltage=-12V, Element Configuration=Single, Fall Time=10ns, Height=0.94mm, Lead Free="Lead Free", Length=2.92mm, Manufacturer Part Number=FDN306P, Mount="Surface Mount", Nominal Vgs=-600mV, Number of Elements=1, Number of Pins=3, On-State Resistance=40MR, Packaging="Tape and Reel", Polarity=P-CHANNEL, Power Dissipation=500mW, Pricing 1="1=0.59000, 10=0.50700, 25=0.47360, 100=0.37880, 500=0.29766, 1000=0.23001 (USD)", Radiation Hardening=No, Rds On Max=40mR, REACH SVHC="No SVHC", Rise Time=10ns, RoHS=Yes, RoHS Compliant=Yes, Series=PowerTrench®, Stock 1=12409, Supplier 1=Digi-Key, Termination=SMD/SMT, Turn-Off Delay Time=38ns, Turn-On Delay Time=11ns, Voltage=12V, Voltage Rating (DC)=-12V, Width=1.4mm
R1: library part RC0603FR-071KL, "RES SMD 1K OHM 1% 1/10W 0603", Case Code (Imperial)=0603, Case Code (Metric)=1608, LCSC Part Number=C22548, Manufacturer=Yageo, Max Operating Temperature=155°C, Min Operating Temperature=-55°C, Power Rating=100mW, Resistance=1kR, Supplier Part Number 1=311-1.00KHRDKR-ND, Temperature Coefficient=100ppm/°C, Tolerance=1%, Voltage Rating=50V, Case/Package=0603, ComponentLink1Description=https://www.verical.com/server-webapp/html/getDatasheet?partID=409289&src-supplier=Verical, ComponentLink1URL=https://www.verical.com/server-webapp/html/getDatasheet?partID=409289&src-supplier=Verical, ComponentLink2Description=http://documents.rs-components.com/techlib://itc_doclist_GB.htm?stockno=5048928&src-supplier=RSComponents, ComponentLink2URL=http://documents.rs-components.com/techlib://itc_doclist_GB.htm?stockno=5048928&src-supplier=RSComponents, ComponentLink3Description=http://www.yageo.com/documents/recent/PYu-RC0603_51_RoHS_L_4.pdf?src-supplier=Avnet+Europe, ComponentLink3URL=http://www.yageo.com/documents/recent/PYu-RC0603_51_RoHS_L_4.pdf?src-supplier=Avnet+Europe, ComponentLink4Description=http://www.farnell.com/datasheets/2167052.pdf?src-supplier=Element14, ComponentLink4URL=http://www.farnell.com/datasheets/2167052.pdf?src-supplier=Element14, ComponentLink5Description=http://www.farnell.com/datasheets/1868787.pdf?src-supplier=Element14, ComponentLink5URL=http://www.farnell.com/datasheets/1868787.pdf?src-supplier=Element14, ComponentLink6Description=http://www.yageo.com/documents/recent/PYu-RC_Group_51_RoHS_L_2.pdf?src-supplier=Avnet, ComponentLink6URL=http://www.yageo.com/documents/recent/PYu-RC_Group_51_RoHS_L_2.pdf?src-supplier=Avnet, ComponentLink7Description=https://www.verical.com/server-webapp/html/getDatasheet?partID=404327&src-supplier=Verical, ComponentLink7URL=https://www.verical.com/server-webapp/html/getDatasheet?partID=404327&src-supplier=Verical, ComponentLink8Description=http://www.farnell.com/datasheets/443971.pdf?src-supplier=Element14, ComponentLink8URL=http://www.farnell.com/datasheets/443971.pdf?src-supplier=Element14, Composition="Thick Film", Contact Plating=Tin,Matte, Depth=0.8mm, Height=0.45mm, Item Type=Resistor, Lead Free="Lead Free", Length=1.6mm, Manufacturer Part Number=RC0603FR-071KL, Military Standard=Not, Packaging="Tape and Reel", Pricing 1="1=0.1, 10=0.023, 100=0.0094, 1000=0.0042, 2500=0.0037 (USD)", Radiation Hardening=No, REACH SVHC="No SVHC", Stock 1=21472395, Supplier 1=Digi-Key, Termination=SMD/SMT
R2 R9 R12 R17 R18 R19 R22 R23 R24 R25 R26 R27: library part RC0201FR-0710KL, "RES SMD 10K OHM 1% 1/20W 0201", LCSC Part Number=C106225, Manufacturer=Yageo, Package=0201, ComponentLink7Description=LCSC, ComponentLink7URL=https://www.lcsc.com/product-detail/Chip-Resistor-Surface-Mount_YAGEO-RC0201FR-0710KL_C106225.html, Item Type=Resistor, Manufacturer Part Number=RC0201FR-0710KL
R3 R21 R29: library part RC0603FR-070RL, "RES SMD 0R, 1%, 0.1W, 0603", LCSC Part Number=C100044, Manufacturer=Yageo, Package=0603, ComponentLink9Description=LCSC, ComponentLink9URL=https://www.lcsc.com/product-detail/Chip-Resistor-Surface-Mount_YAGEO-RC0603FR-070RL_C100044.html, Item Type=Resistor, Manufacturer Part Number=RC0603FR-070RL
R4 R5 R15 R16: library part RC0603FR-0749R9L, "RES 49.9 OHM 1% 1/10W 0603", Case Code (Imperial)=0603, Case Code (Metric)=1608, LCSC Part Number=C114625, Manufacturer=Yageo, Max Operating Temperature=155°C, Max Power Dissipation=100mW, Min Operating Temperature=-55°C, Resistance Tolerance=1%, Resistor Type="Thick Film", Temperature Coefficient=100ppm/°C, Voltage Rating=50V, Case/Package=0603, Category="Chip SMD Resistors", ComponentLink1Description=https://datasheet.ciiva.com/11808/0900766b80f96399-11808223.pdf?src-supplier=RSComponents, ComponentLink1URL=https://datasheet.ciiva.com/11808/0900766b80f96399-11808223.pdf?src-supplier=RSComponents, ComponentLink2Description=https://datasheet.ciiva.com/22747/443971-22747527.pdf?src-supplier=Element14, ComponentLink2URL=https://datasheet.ciiva.com/22747/443971-22747527.pdf?src-supplier=Element14, ComponentLink3Description=https://datasheet.ciiva.com/15189/getdatasheetpartid-325421-15189750.pdf?src-supplier=Verical, ComponentLink3URL=https://datasheet.ciiva.com/15189/getdatasheetpartid-325421-15189750.pdf?src-supplier=Verical, Construction=Rectangular, Depth=0.8mm, Features="Moisture Resistant", Height=0.45mm, Item Type=Resistor, Lead Free="Lead Free", Length=1.6mm, Manufacturer Part Number=RC0603FR-0749R9L, Military Standard=Not, Number of Pins=2, Number of Terminations=2, Packaging="Tape and Reel", Power Rating=100mW, Pricing 1="5000=0.00280 (USD)", REACH SVHC="No SVHC", Resistance=49.9R, RoHS=Yes, RoHS Compliant=Yes, Series=RC, Size Code=0603, Stock 1=2075000, Supplier 1="Arrow Electronics", Supplier Part Number 1=RC0603FR-0749R9L, Technology="THICK FILM", Termination=SMD/SMT, Tolerance=1%, Voltage Rating (DC)=50V
R6: library part RC0603FR-0710RL, "RES SMD 10 OHM 1% 1/10W 0603", Case Code (Imperial)=0603, Case Code (Metric)=1608, LCSC Part Number=C109318, Manufacturer=Yageo, Max Operating Temperature=155°C, Min Operating Temperature=-55°C, Power Rating=100mW, Supplier Part Number 1=311-10.0HRDKR-ND, Temperature Coefficient=200ppm/°C, Tolerance=1%, Voltage Rating=50V, Case/Package=0603, ComponentLink1Description=http://www.farnell.com/datasheets/1868787.pdf?src-supplier=Element14, ComponentLink1URL=http://www.farnell.com/datasheets/1868787.pdf?src-supplier=Element14, ComponentLink2Description=http://www.yageo.com/documents/recent/PYu-RC0603_51_RoHS_L_4.pdf?src-supplier=Avnet, ComponentLink2URL=http://www.yageo.com/documents/recent/PYu-RC0603_51_RoHS_L_4.pdf?src-supplier=Avnet, ComponentLink3Description=http://documents.rs-components.com/techlib://itc_doclist_GB.htm?stockno=5048984&src-supplier=RSComponents, ComponentLink3URL=http://documents.rs-components.com/techlib://itc_doclist_GB.htm?stockno=5048984&src-supplier=RSComponents, ComponentLink4Description=http://www.yageo.com/documents/recent/PYu-RC0603_51_RoHS_L_4.pdf?src-supplier=Avnet+Europe, ComponentLink4URL=http://www.yageo.com/documents/recent/PYu-RC0603_51_RoHS_L_4.pdf?src-supplier=Avnet+Europe, Composition="Thick Film", Contact Plating=Tin,Matte, Depth=0.8mm, Height=0.45mm, Item Type=Resistor, Lead Free="Lead Free", Length=1.6mm, Manufacturer Part Number=RC0603FR-0710RL, Military Standard=Not, Number of Pins=2, Packaging="Tape and Reel", Pricing 1="1=0.1, 10=0.046, 100=0.0187, 1000=0.0084, 2500=0.00729 (USD)", Radiation Hardening=No, REACH SVHC="No SVHC", Resistance=10R, Stock 1=10836596, Supplier 1=Digi-Key, Termination=SMD/SMT, Voltage Rating (DC)=50V, Width=0.8mm
R7 R8 R11 R13: library part RC0603FR-0733RL, "RES SMD 0603 33 Ohm 1% 1/10W", Case Code (Imperial)=0603, Case Code (Metric)=1608, LCSC Part Number=C108661, Manufacturer=Yageo, Max Operating Temperature=155°C, Max Power Dissipation=100mW, Min Operating Temperature=-55°C, Package Quantity=1, Resistance Tolerance=1%, Resistor Type="Thick Film", Supplier Part Number 1=311-33.0HRCT-ND, Temperature Coefficient=100ppm/°C, Voltage Rating=75V, Voltage Rating (DC)=50V, Case/Package=0603, Category="Chip SMD Resistors", ComponentLink1Description=https://datasheet.ciiva.com/11808/0900766b80f96399-11808741.pdf?src-supplier=RSComponents, ComponentLink1URL=https://datasheet.ciiva.com/11808/0900766b80f96399-11808741.pdf?src-supplier=RSComponents, ComponentLink2Description=https://datasheet.ciiva.com/2453/pyu-r-int-thick-7-2453952.pdf?src-supplier=Digi-Key, ComponentLink2URL=https://datasheet.ciiva.com/2453/pyu-r-int-thick-7-2453952.pdf?src-supplier=Digi-Key, ComponentLink3Description=https://datasheet.ciiva.com/2453/pyu-r-int-thick-7-2453953.pdf?src-supplier=Digi-Key, ComponentLink3URL=https://datasheet.ciiva.com/2453/pyu-r-int-thick-7-2453953.pdf?src-supplier=Digi-Key, ComponentLink4Description=https://datasheet.ciiva.com/2453/pyu-r-int-thick-7-2453954.pdf?src-supplier=Digi-Key, ComponentLink4URL=https://datasheet.ciiva.com/2453/pyu-r-int-thick-7-2453954.pdf?src-supplier=Digi-Key, ComponentLink5Description=https://datasheet.ciiva.com/7660/38590-7660792.pdf?src-supplier=Element14, ComponentLink5URL=https://datasheet.ciiva.com/7660/38590-7660792.pdf?src-supplier=Element14, ComponentLink6Description=https://datasheet.ciiva.com/15189/getdatasheetpartid-326673-15189708.pdf?src-supplier=Verical, ComponentLink6URL=https://datasheet.ciiva.com/15189/getdatasheetpartid-326673-15189708.pdf?src-supplier=Verical, ComponentLink7Description=https://datasheet.ciiva.com/7746/443971-7746334.pdf?src-supplier=Element14, ComponentLink7URL=https://datasheet.ciiva.com/7746/443971-7746334.pdf?src-supplier=Element14, ComponentLink8Description=https://datasheet.ciiva.com/7746/443971-7746335.pdf?src-supplier=Element14, ComponentLink8URL=https://datasheet.ciiva.com/7746/443971-7746335.pdf?src-supplier=Element14, ComponentLink9Description=https://datasheet.ciiva.com/46395/443971-46395007.pdf?src-supplier=Element14, ComponentLink9URL=https://datasheet.ciiva.com/46395/443971-46395007.pdf?src-supplier=Element14, Construction=Rectangular, Depth=0.8mm, Features="Moisture Resistant", Height=0.45mm, Item Type=Resistor, Lead Free="Lead Free", Lead Pitch=0.3mm, Length=1.6mm, Manufacturer Part Number=RC0603FR-0733RL, Military Standard=Not, Number of Pins=2, Number of Terminations=2, Packaging="Tape and Reel", Power Rating=100mW, Pricing 1="1=0.10000, 10=0.02400, 100=0.00970, 1000=0.00436, 2500=0.00378 (USD)", REACH SVHC="No SVHC", Resistance=33R, RoHS=Yes, RoHS Compliant=Yes, Series=RC, Size Code=0603, Stock 1=41, Supplier 1=Digi-Key, Technology="THICK FILM", Termination=SMD/SMT, Tolerance=1%, Weight=7.1E-05oz, Width=0.8mm
R10 R14: library part RC0603JR-07330RL, "RES  SMD 330R 100 mW 0603", Case Code (Imperial)=0603, Case Code (Metric)=1608, LCSC Part Number=C105879, Manufacturer=Yageo, Max Operating Temperature=155°C, Max Power Dissipation=100mW, Min Operating Temperature=-55°C, Package Quantity=5000, Resistance Tolerance=5%, Resistor Type="Thick Film", Supplier Part Number 1=311-330GRCT-ND, Temperature Coefficient=100ppm/°C, Voltage Rating=50V, Case/Package=0603, Category="Chip SMD Resistors", Construction=Rectangular, Depth=0.8mm, Features="Moisture Resistant", Height=0.45mm, Item Type=Resistor, Lead Free="Lead Free", Length=1.6mm, Manufacturer Part Number=RC0603JR-07330RL, Military Standard=Not, Number of Pins=2, Number of Terminations=2, Packaging="Tape and Reel", Power Rating=100mW, Pricing 1="1=0.10000, 10=0.02000, 100=0.00800, 1000=0.00360, 2500=0.00312 (USD)", REACH SVHC="No SVHC", Resistance=330R, RoHS=Yes, RoHS Compliant=Yes, Series=RC, Size Code=0603, Stock 1=1074593, Supplier 1=Digi-Key, Termination=SMD/SMT, Tolerance=5%, Voltage Rating (DC)=50V, Width=0.8mm
R20: library part RC0603FR-071ML, "RES SMD 1M OHM 1% 1/10W 0603", Case Code (Imperial)=0603, Case Code (Metric)=1608, LCSC Part Number=C105578, Manufacturer=Yageo, Max Operating Temperature=155°C, Min Operating Temperature=-55°C, Package Quantity=5000, Power Rating=100mW, Resistance=1MR, Supplier Part Number 1=311-1.00MHRDKR-ND, Temperature Coefficient=100ppm/°C, Tolerance=1%, Voltage Rating=50V, Case/Package=0603, ComponentLink1Description=http://www.farnell.com/datasheets/2167052.pdf?src-supplier=Mouser, ComponentLink1URL=http://www.farnell.com/datasheets/2167052.pdf?src-supplier=Mouser, ComponentLink2Description=http://www.farnell.com/datasheets/2167052.pdf?src-supplier=Element14, ComponentLink2URL=http://www.farnell.com/datasheets/2167052.pdf?src-supplier=Element14, ComponentLink3Description=http://documents.rs-components.com/techlib://itc_doclist_GB.htm?stockno=5048956&src-supplier=RSComponents, ComponentLink3URL=http://documents.rs-components.com/techlib://itc_doclist_GB.htm?stockno=5048956&src-supplier=RSComponents, Composition="Thick Film", Depth=0.8mm, Height=0.45mm, Lead Free="Lead Free", Length=1.6mm, Manufacturer Part Number=RC0603FR-071ML, Military Standard=Not, Number of Pins=2, Packaging="Tape and Reel", Pricing 1="1=0.1, 10=0.023, 100=0.0094, 1000=0.00421, 2500=0.00366 (USD)", REACH SVHC="No SVHC", Stock 1=3824601, Supplier 1=Digi-Key, Termination=SMD/SMT, Voltage Rating (DC)=50V, Width=0.8mm
R28: library part RC0603FR-0712K4L, "RES SMD 12.4K OHM 1% 1/10W 0603", Case Code (Imperial)=0603, Case Code (Metric)=1608, LCSC Part Number=C137798, Manufacturer=Yageo, Max Operating Temperature=155°C, Max Power Dissipation=100mW, Min Operating Temperature=-55°C, Package Quantity=1, Resistance=12.4kR, Resistor Type="Thick Film", Supplier Part Number 1=311-12.4KHRCT-ND, Temperature Coefficient=100ppm/°C, Tolerance=1%, Voltage Rating=50V, Working Voltage=75V, Case/Package=0603, Category="Chip SMD Resistors", ComponentLink1Description=https://datasheet.ciiva.com/2454/pyu-r-int-thick-7-2454069.pdf?src-supplier=Digi-Key, ComponentLink1URL=https://datasheet.ciiva.com/2454/pyu-r-int-thick-7-2454069.pdf?src-supplier=Digi-Key, ComponentLink2Description=https://datasheet.ciiva.com/2454/pyu-r-int-thick-7-2454070.pdf?src-supplier=Digi-Key, ComponentLink2URL=https://datasheet.ciiva.com/2454/pyu-r-int-thick-7-2454070.pdf?src-supplier=Digi-Key, ComponentLink3Description=https://datasheet.ciiva.com/2454/pyu-r-int-thick-7-2454071.pdf?src-supplier=Digi-Key, ComponentLink3URL=https://datasheet.ciiva.com/2454/pyu-r-int-thick-7-2454071.pdf?src-supplier=Digi-Key, Construction=Rectangular, Depth=0.8mm, Features="Moisture Resistant", Height=0.022inch, Lead Free="Lead Free", Length=0.063inch, Manufacturer Part Number=RC0603FR-0712K4L, Military Standard=Not, Number of Terminations=2, Packaging="Tape and Reel", Power Rating=100mW, Pricing 1="1=0.10000, 10=0.02400, 100=0.00970, 1000=0.00436, 2500=0.00378 (USD)", RoHS=Yes, RoHS Compliant=Yes, Series=RC, Stock 1=494008, Supplier 1=Digi-Key, Technology="THICK FILM", Termination=SMD/SMT, Voltage Rating (DC)=50V, Width=0.031inch
R30: library part RC0402FR-074K7L, "RES 4.7K OHM 1% 1/16W 0402", Case Code (Imperial)=0402, Case Code (Metric)=1005, LCSC Part Number=C105871, Manufacturer=Yageo, Max Operating Temperature=155°C, Max Power Dissipation=63mW, Min Operating Temperature=-55°C, Power Rating=62.5mW, Resistance=4.7kR, Resistance Tolerance=1%, Resistor Type="Thick Film", Temperature Coefficient=100ppm/°C, Voltage Rating=50V, Case/Package=0402, Category="Chip SMD Resistors", ComponentLink1Description=https://datasheet.ciiva.com/22661/1686128-22661342.pdf?src-supplier=Element14, ComponentLink1URL=https://datasheet.ciiva.com/22661/1686128-22661342.pdf?src-supplier=Element14, ComponentLink2Description=https://datasheet.ciiva.com/7850/1018594-7850022.pdf?src-supplier=Element14, ComponentLink2URL=https://datasheet.ciiva.com/7850/1018594-7850022.pdf?src-supplier=Element14, ComponentLink3Description=https://datasheet.ciiva.com/7850/1018594-7850023.pdf?src-supplier=Element14, ComponentLink3URL=https://datasheet.ciiva.com/7850/1018594-7850023.pdf?src-supplier=Element14, ComponentLink4Description=https://datasheet.ciiva.com/15215/getdatasheetpartid-328119-15215035.pdf?src-supplier=Verical, ComponentLink4URL=https://datasheet.ciiva.com/15215/getdatasheetpartid-328119-15215035.pdf?src-supplier=Verical, Construction=Rectangular, Depth=0.5mm, Features="Moisture Resistant", Height=0.32mm, Height - Seated (Max)=0.016inch, Item Type=Resistor, Lead Free="Lead Free", Length=1mm, Manufacturer Part Number=RC0402FR-074K7L, Military Standard=Not, Number of Pins=2, Number of Terminations=2, Packaging="Tape and Reel", Pricing 1="10000=0.00085 (USD)", Reach SVHC Compliant=Yes, RoHS=Yes, RoHS Compliant=Yes, Series=RC, Size Code=0402, Stock 1=2420000, Supplier 1=Avnet, Supplier Part Number 1=RC0402FR-074K7L, Termination=SMD/SMT, Tolerance=1%, Voltage Rating (DC)=50V, Width=0.5mm
U1: "SPI LQFP-48(7x7) Ethernet ICs ROHS", LCSC Part Number=C32843, Manufacturer=WIZNET, Package=LQFP-48(7x7), ComponentLink1Description=LCSC, ComponentLink1URL=https://www.lcsc.com/product-detail/Ethernet-ICs_WIZNET-W5500_C32843.html, Item Type=IC, Manufacturer Part Number=W5500
X1: library part NX3225GA-25MHZ-STD-CRG-2, "SMD3225-4P Crystals ROHS", LCSC Part Number=C438901, Manufacturer=NDK, Package=SMD3225-4P, ComponentLink1Description=LCSC, ComponentLink1URL=https://www.lcsc.com/product-detail/Crystals_NDK-NX3225GA-25MHZ-STD-CRG-2_C438901.html, Item Type=Crystal, Manufacturer Part Number=NX3225GA-25MHZ-STD-CRG-2

## Free pads (board coordinates)
  round 0 hole 3 unplated: MH(11.759,46.376)

## Via types
v1: diameter 0.6, hole 0.3, Top Layer to Bottom Layer, 62 vias

## Nets (pads, with @x,y where several pads share a name; then routed paths per layer and width w, separated by ;. In a path a pad name is that pad's centre, name@x,y a point inside that pad or via, vN(x,y) a via of type N, cw(c..) or ccw(c..) an arc to the next point about the centre after c; other vN are vias at no path point)
3V3: C1.2 J2.6 J2.24 J2.52 Q2.2 R2.1 R3.2 R29.2 | length 1.1
  Top Layer w0.762: C1.2 7.568,5.71 v1(7.57,5.712)
  other v1: 10.312,5.712
ACTLED: R10.2 U1.27 | length 64.2
  Top Layer w0.254: U1.27@20.166,10.517 U1.27 20.165,8.516 19.825,8.176 18.006,8.176 17.666,8.516 17.666,9.816 17.373,10.109 13.056,10.109 12.192,10.973 12.192,38.557 14.707,41.072 14.707,47.193 15.799,48.285 26.314,48.285 26.941,47.659 R10.2
CT_R: C15.2 J1.4 R15.1 R16.1 | length 13.5
  Top Layer w0.381: J1.4 25.441,31.967 25.908,31.5 C15.2
  Bottom Layer w0.381: R16.1 R15.1 25.727,25.248 26.483,26.004 26.483,31.244 J1.4
CT_T: C14.2 J1.9 R6.1 | length 3.9
  Top Layer w0.508: R6.1 18.305,34.186 18.945,34.826 J1.9 19.091,35.104 19.599,35.612 C14.2
GND: C2.1 C3.1 C4.1 C5.1 C6.1 C7.1 C8.1 C9.1 C10.1 C11.1 C14.1 C15.1 C16.1 C17.1 C18.1 C19.1 D1.3 D2.3 J1.2 J1.7 J1.SH1 J1.SH2 J2.4 J2.9 J2.15 J2.17 J2.18 J2.19 J2.21 J2.23 J2.25 J2.26 J2.27 J2.28 J2.29 J2.34 J2.35 J2.40 J2.42 J2.44 J2.47 J2.49 J2.50 J2.51 Q1.2 R22.2 R23.2 R24.1 R25.2 R26.2 R27.1 R28.1 U1.3 U1.9 U1.14 U1.16 U1.19 U1.29 U1.48 X1.2 X1.4 | length 61.3
  Top Layer w0.254: 13.515,38.303 13.692,38.126 ; v1(16.409,14.633) 16.503,14.633 16.62,14.516 U1.19 ; v1(16.409,15.893) 16.503,15.893 16.625,16.016 U1.16 ; v1(16.409,17.516) 16.886,17.038 17.642,17.038 U1.14 ; v1(18.423,9.022) v1@18.517,9.022 ; 20.403,17.836 20.665,18.098 U1.9 ; v1(21.031,9.022) 21.031,9.115 21.165,9.249 U1.29 21.165,11.725 ; U1.3 23.665,18.098 23.926,17.836
  Top Layer w0.381: C15.1 27.432,31.5 27.981,32.049 J1.2 ; J1.SH2@31.334,38.049 J1.SH2
  Top Layer w0.508: C14.1 21.123,35.612 21.631,35.104 J1.7
  Top Layer w0.559: X1.4 19.446,5.146 20.378,5.146 v1(20.386,5.154) 20.392,5.16 21.091,5.16 C18.1
  Top Layer w0.762: 13.692,38.126 J1.SH1 ; D1.3 26.981,39.049 27.981,38.049 J1.SH2@31.334,38.049 ; J1.2 30.647,32.286 31.411,33.05 J1.SH2
  Bottom Layer w0.254: 12.395,8.62 12.797,9.022 v1(18.423,9.022)
  Bottom Layer w1.016: 12.268,37.821 12.574,38.126 ; J1.SH1 21.462,38.126 ; J1.7 21.631,37.957 21.462,38.126 ; J1.SH2 21.462,38.126
  Bottom Layer w1.524: 12.574,38.126 J1.SH1
  other v1: 16.282,0.142 18.306,0.142 21.5,0.142 26.992,0.142 8.267,3.117 9.149,3.117 9.951,3.117 1.854,3.378 2.85,3.378 1.854,4.369 2.85,4.369 1.854,5.329 2.85,5.329 27.532,5.573 27.532,6.716 16.15,7.378 18.119,11.184 29.845,12.416 29.845,13.254 19.277,14.602 13.852,17.516 2.027,21.285 3.023,21.285 2.027,22.276 3.023,22.276 2.027,23.236 3.023,23.236
LAN_ACT: J1.12 R10.1 | length 1.8
  Top Layer w0.508: R10.1 J1.12
LAN_LINK: J1.14 R14.1 | length 1.7
  Top Layer w0.381: J1.14 J1.14@16.882,45.817
  Top Layer w0.508: J1.14@16.882,45.817 R14.1
LINKLED: R14.2 U1.25 | length 50.4
  Top Layer w0.254: U1.25 19.139,10.541 13.234,10.541 12.624,11.152 12.624,38.303 15.189,40.869 15.189,46.934 16.033,47.777 19.406,47.777 20.015,47.168 R14.2
NetC1_1: C1.1 Q2.1 R1.1 R2.2 | length 0.6
  Bottom Layer w0.381: v1(5.537,7.239) 6.146,7.239 R1.1
NetC9_2: C9.2 FB1.1 Q2.3 R3.1